# Altium PCB RTL8316_STAND.PcbDoc (part 4 of 4)
Units mm, origin at the board's own origin, x right, y up, seen from the top; angles counter-clockwise.
Board outline 155 x 217 mm, 4 copper layers (Top, Ground, Power, Bottom), stack 1.012 mm thick; 305 components, 396 nets, 1247 pads, 345 vias.
Unrouted connection lines stored in the file: 59.
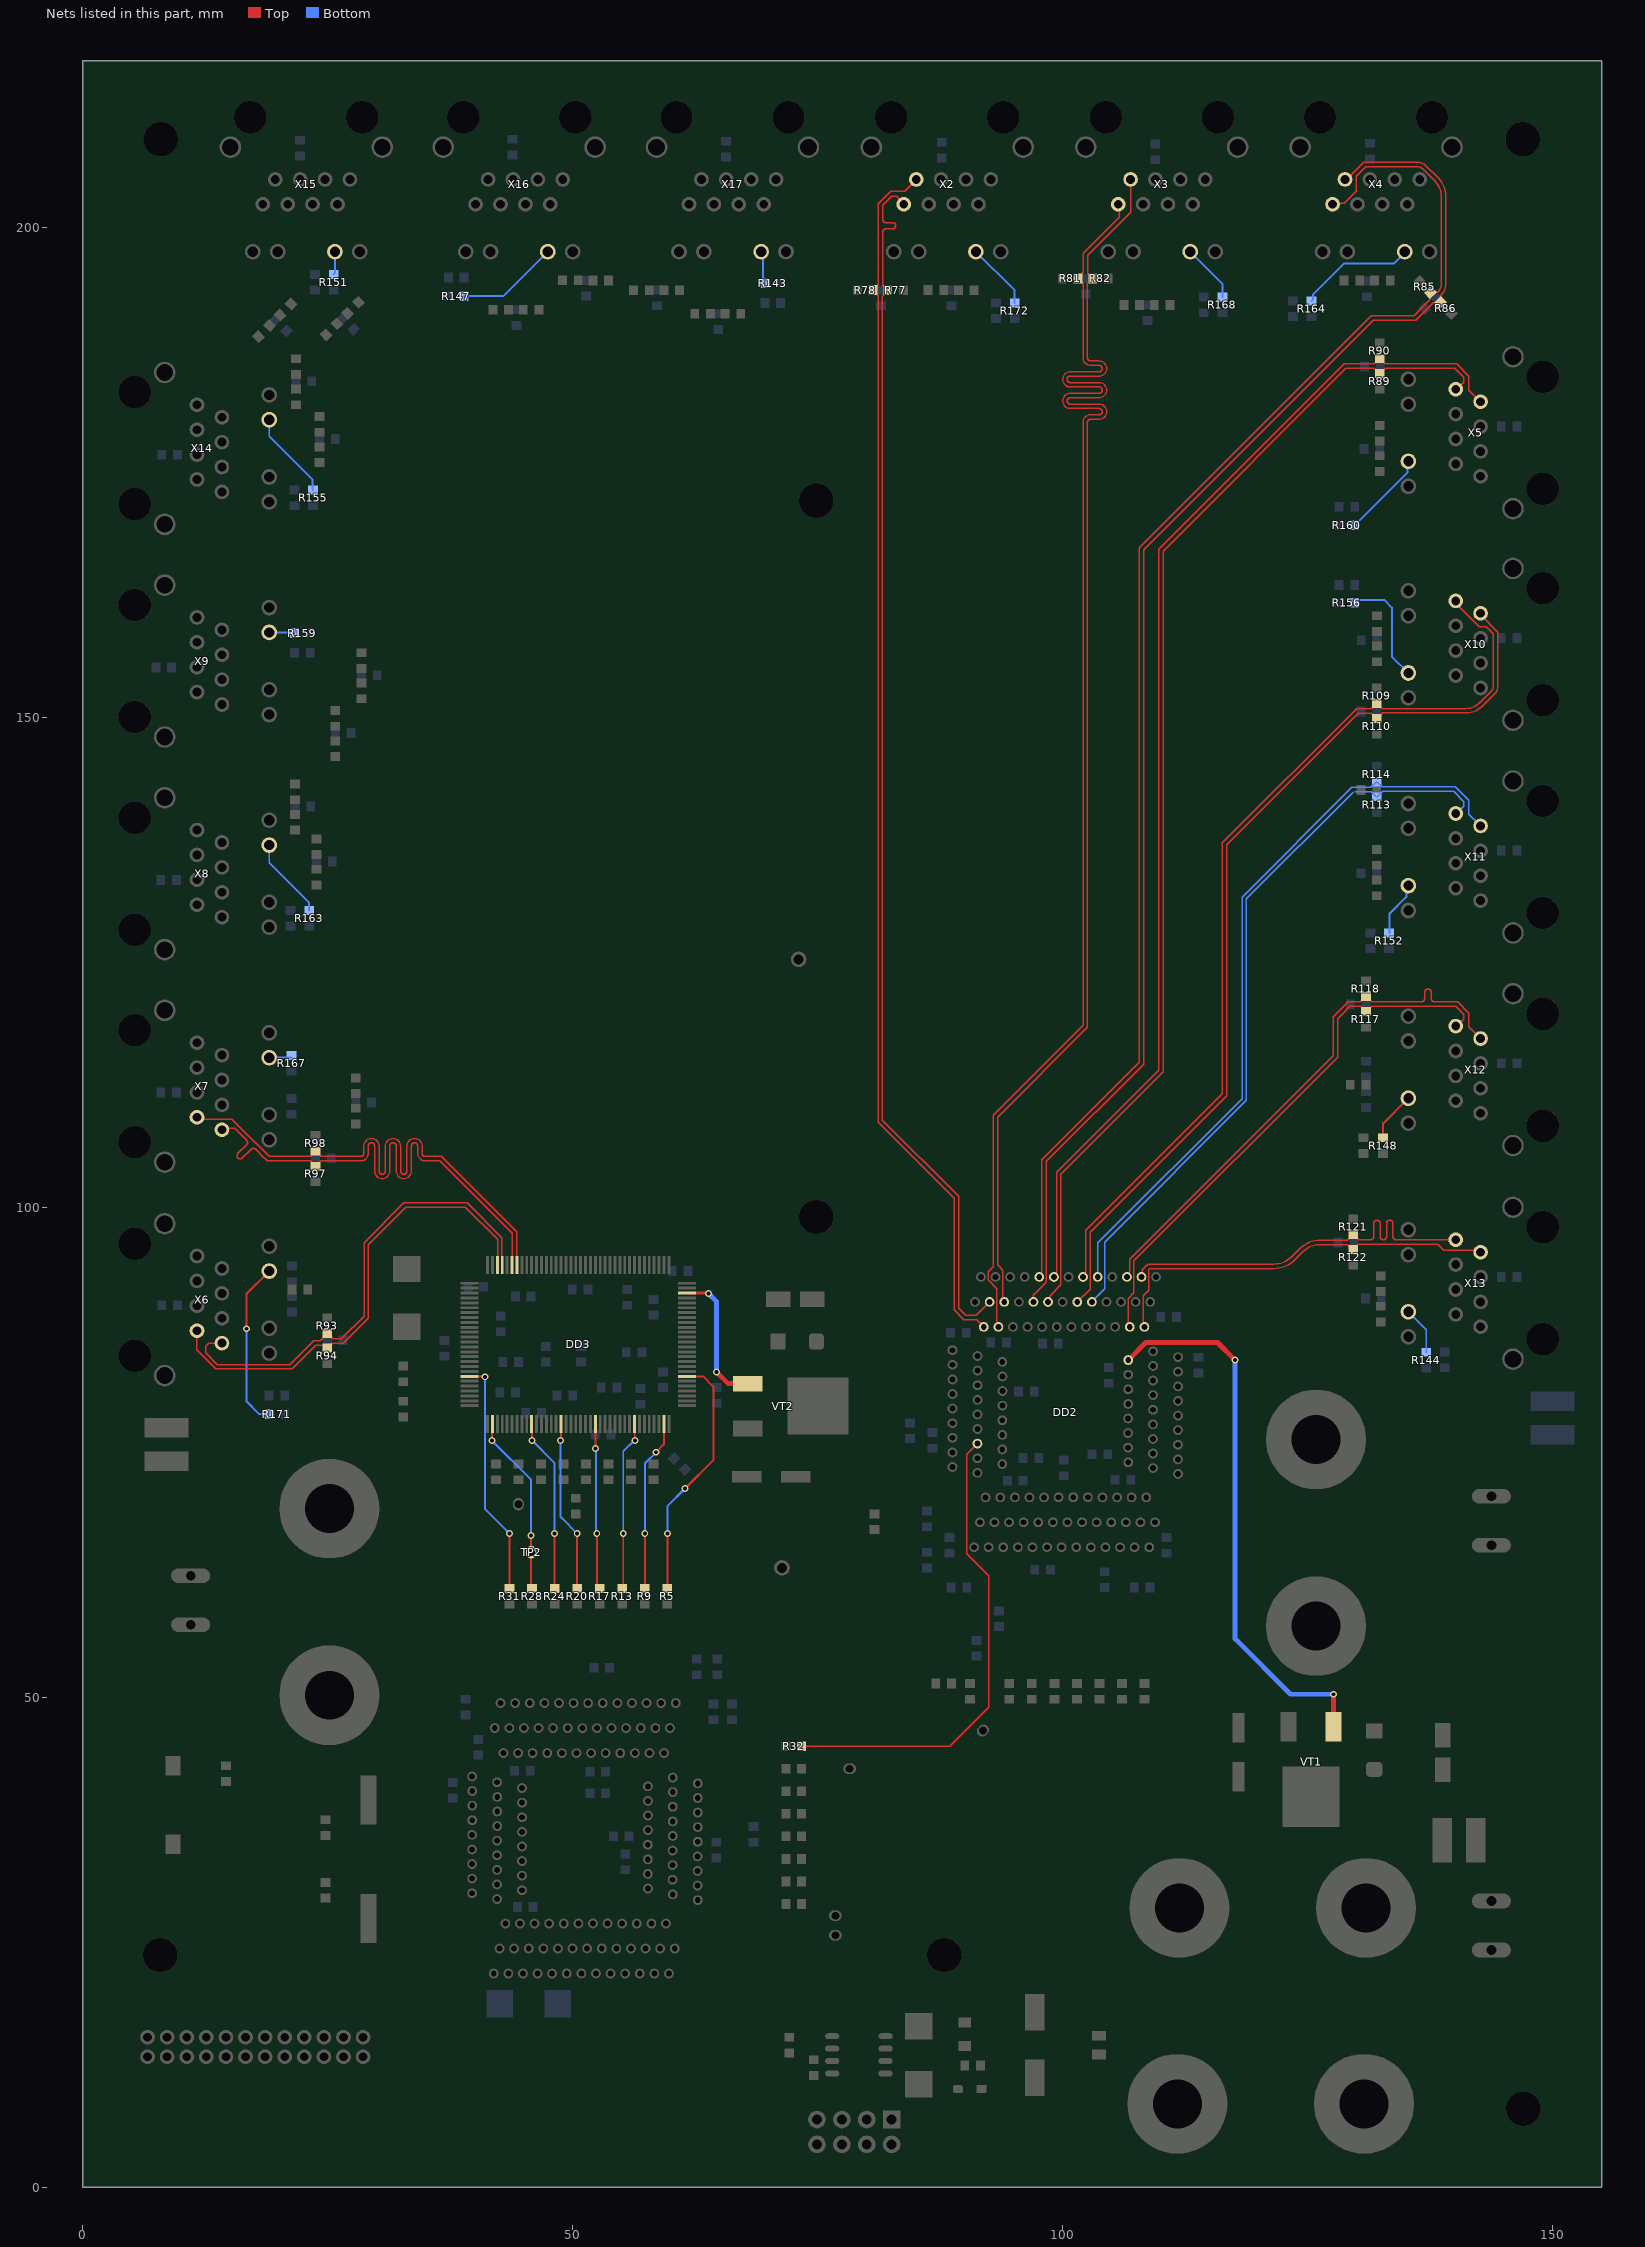
[diagram p6: the nets of this part, all layers, seen from the top]

## Via types
v1: diameter 0.7, hole 0.4, Top to Bottom, tented both sides, 332 vias
v2: diameter 1.2, hole 0.6, Top to Bottom, tented both sides, 11 vias
v3: diameter 0.9, hole 0.4, Top to Bottom, tented both sides, 2 vias

## Nets (pads, with @x,y where several pads share a name; then routed paths per layer and width w, separated by ;. In a path a pad name is that pad's centre, name@x,y a point inside that pad or via, vN(x,y) a via of type N, cw(c..) or ccw(c..) an arc to the next point about the centre after c; other vN are vias at no path point) (continued)
TX6_N: DD3.32 R98.1 X7.2 | length 56.8
  Top w0.15: X7.2@11.65,109.18 11.83,109 15.186,109 16.318,107.868 19,105.186 23.151,105.186 ccw(c23.151,105.394) 23.298,105.247 ccw(c23.233,105.312) 23.325,105.312 cw(c23.417,105.312) 23.352,105.377 23.665,105.69 cw(c23.75,105.604) R98.1@23.75,105.725 cw(c23.75,105.604) 23.835,105.69 24.148,105.377 cw(c24.083,105.312) 24.175,105.312 ccw(c24.267,105.312) 24.202,105.247 24.219,105.23 ccw(c24.325,105.336) 24.325,105.186 28.05,105.186 28.35,105.186 ccw(c28.35,105.511) 28.675,105.511 28.675,106.254 cw(c29.45,106.254) 29.45,107.029 cw(c29.45,106.254) 30.225,106.254 30.225,103.701 ccw(c30.55,103.701) 30.55,103.376 ccw(c30.55,103.701) 30.875,103.701 30.875,106.254 cw(c31.65,106.254) 31.65,107.029 cw(c31.65,106.254) 32.425,106.254 32.425,103.701 ccw(c32.75,103.701) 32.75,103.376 ccw(c32.75,103.701) 33.075,103.701 33.075,106.254 cw(c33.85,106.254) 33.85,107.029 cw(c33.85,106.254) 34.625,106.254 34.625,105.511 ccw(c34.95,105.511) 34.95,105.186 35.85,105.186 36.6,105.186 44.275,97.511 44.275,94.125 DD3.32@44.3,94.1
TX6_P: DD3.33 R97.1 X7.1 | length 56.6
  Top w0.15: X7.1@14.19,107.91 14.333,108.053 15.497,108.053 16.2,107.35 16.253,107.297 16.713,106.837 cw(c16.483,106.608) 16.713,106.378 15.829,105.494 ccw(c16.059,105.264) 15.829,105.034 ccw(c16.059,105.264) 16.289,105.034 17.172,105.918 cw(c17.402,105.688) 17.632,105.918 18.484,105.066 18.537,105.013 18.814,104.736 23.151,104.736 23.237,104.736 23.298,104.675 cw(c23.233,104.61) 23.325,104.61 ccw(c23.417,104.61) 23.352,104.545 23.665,104.232 ccw(c23.75,104.318) R97.1@23.75,104.197 ccw(c23.75,104.318) 23.835,104.232 24.148,104.545 ccw(c24.083,104.61) 24.175,104.61 cw(c24.267,104.61) 24.202,104.675 24.219,104.692 cw(c24.325,104.586) 24.325,104.736 28.05,104.736 28.35,104.736 ccw(c28.35,105.511) 29.125,105.511 29.125,106.254 cw(c29.45,106.254) 29.45,106.579 cw(c29.45,106.254) 29.775,106.254 29.775,103.701 ccw(c30.55,103.701) 30.55,102.926 ccw(c30.55,103.701) 31.325,103.701 31.325,106.254 cw(c31.65,106.254) 31.65,106.579 cw(c31.65,106.254) 31.975,106.254 31.975,103.701 ccw(c32.75,103.701) 32.75,102.926 ccw(c32.75,103.701) 33.525,103.701 33.525,106.254 cw(c33.85,106.254) 33.85,106.579 cw(c33.85,106.254) 34.175,106.254 34.175,105.511 ccw(c34.95,105.511) 34.95,104.736 35.85,104.736 36.414,104.736 43.825,97.325 43.825,94.125 DD3.33@43.8,94.1
TX7: DD2.58 R32.1 | length 49
  Top w0.15: R32.1@73.35,45 88.45,45 92.45,49 92.45,62.4 90.225,64.625 90.225,74.805 DD2.58@91.3,75.88
TX7_N: DD3.36 R94.1 X6.2 | length 48.9
  Top w0.15: X6.2@11.7,87.355 11.65,87.305 ccw(c11.771,87.184) 11.6,87.184 11.6,85.45 13.55,83.5 21.35,83.5 23.75,85.9 24.675,85.9 R94.1@24.95,85.625 ; R94.1@25,85.625 25.488,86.113 26.563,86.113 29.15,88.7 29.15,96.2 32.95,100 39.05,100 42.325,96.725 42.325,94.125 DD3.36@42.3,94.1
TX7_P: DD3.35 R93.1 X6.1 | length 49.1
  Top w0.15: X6.1@14.19,86.135 13.045,86.135 12.836,86.135 12.524,85.824 12.524,85.162 13.736,83.95 21.1,83.95 23.55,86.4 24.225,86.4 R93.1@24.95,87.125 ; R93.1@25,87.125 25.562,86.563 26.376,86.563 28.7,88.886 28.7,96.386 32.764,100.45 39.236,100.45 42.775,96.911 42.775,94.125 DD3.35@42.8,94.1
  Bottom w0.15: X6.1@14.19,86.135 X6.1@14.195,86.14
TX8: DD3.109 R5.1 | length 25.9
  Top w0.2: R5.1@59.65,60.9 R5.1@59.65,61.1 v1(59.65,66.7) ; v1(61.45,71.3) 64.35,74.2 64.35,81.699 63.299,82.75 DD3.109@61.65,82.75
  Bottom w0.2: v1(59.65,66.7) 59.65,69.5 v1(61.45,71.3)
TX8_N: DD2.3 R122.1 X13.2 | length 41.6
  Top w0.15: DD2.3@108.335,87.8 108.21,87.925 108.21,90.96 108.805,91.555 108.805,93.662 108.893,93.75 121.562,93.75 ccw(c121.562,96.74) 123.676,94.626 124.506,95.456 cw(c126.302,93.66) 126.302,96.2 129.1,96.2 129.6,95.7 R122.1@129.65,95.7 129.7,95.7 130.075,96.075 130.075,96.137 130.173,96.235 138.26,96.235 138.895,95.6 142.47,95.6 X13.2@142.65,95.42
TX8_P: DD2.4 R121.1 X13.1 | length 41.1
  Top w0.15: DD2.4@108.04,92.9 108.125,92.985 108.125,93.625 108.425,93.925 108.431,93.925 108.706,94.2 121.562,94.2 ccw(c121.562,96.74) 123.358,94.944 124.188,95.774 cw(c126.302,93.66) 126.302,96.65 129.05,96.65 129.6,97.2 R121.1@129.65,97.2 129.7,97.2 130.215,96.685 131.35,96.685 131.425,96.685 ccw(c131.425,97.01) 131.75,97.01 131.75,98.36 cw(c132.075,98.36) 132.075,98.685 cw(c132.075,98.36) 132.4,98.36 132.4,97.01 ccw(c132.725,97.01) 132.725,96.685 ccw(c132.725,97.01) 133.05,97.01 133.05,98.36 cw(c133.375,98.36) 133.375,98.685 cw(c133.375,98.36) 133.7,98.36 133.7,97.01 ccw(c134.025,97.01) 134.025,96.685 134.45,96.685 135.705,96.685 135.71,96.69 X13.1@140.11,96.69
TX9: DD3.101 R9.1 | length 17.6
  Top w0.2: R9.1@57.35,61.1 v1(57.35,66.7) ; v1(58.5,75) 59.3,75.8 DD3.101@59.3,77.9
  Bottom w0.2: v1(57.35,66.7) 57.35,73.85 v1(58.5,75)
TX9_N: DD2.7 R118.1 X12.2 | length 56
  Top w0.15: DD2.7@106.55,92.9 106.55,93.13 106.825,93.405 106.825,94.711 127.6,115.486 127.6,118.093 127.6,119.45 128.323,120.173 129.03,120.88 129.125,120.975 130.376,120.975 130.901,121.5 R118.1@130.951,121.5 131.001,121.5 131.516,120.985 136.55,120.985 136.625,120.985 ccw(c136.625,121.31) 136.95,121.31 136.95,121.956 cw(c137.275,121.956) 137.275,122.281 cw(c137.275,121.956) 137.6,121.956 137.6,121.31 ccw(c137.925,121.31) 137.925,120.985 138.95,120.985 140.301,120.985 141.462,119.824 141.462,118.408 X12.2@142.65,117.22 X12.2@142.43,117.22
TX9_P: DD2.6 R117.1 X12.1 | length 56.1
  Top w0.15: DD2.6@106.845,87.8 106.697,87.947 106.697,90.691 107.275,91.268 107.275,94.525 128.05,115.3 128.05,118.279 128.05,119.264 128.509,119.723 129.286,120.5 130.4,120.5 130.9,120 R117.1@130.95,120 131,120 131.535,120.535 140.115,120.535 140.95,119.7 140.95,119.209 X12.1@140.231,118.49
TX10: DD3.95 R13.1 | length 17.5
  Top w0.2: R13.1@55.15,61 v1(55.15,66.7) ; DD3.95@56.3,77.9 56.325,77.875 56.325,76.225 v1(56.35,76.2)
  Bottom w0.2: v1(55.15,66.7) 55.15,75.1 56.25,76.2 v1(56.35,76.2)
TX10_N: DD2.13 R114.1 X11.2 | length 76.9
  Bottom w0.15: DD2.13@103.57,92.9 103.57,96.356 103.89,96.676 118.3,111.086 118.3,131.65 129.5,142.85 131.452,142.85 132.001,143.4 R114.1@132.051,143.4 132.101,143.4 132.601,142.9 135.843,142.9 140.086,142.9 141.462,141.524 141.462,140.108 X11.2@142.55,139.02 ; X11.2@142.55,139.02 X11.2@142.65,138.92 X11.2@142.55,139.02
TX10_P: DD2.14 R113.1 X11.1 | length 76.6
  Bottom w0.15: DD2.14@102.975,90.35 104.295,91.67 104.295,96.445 118.75,110.9 118.75,131.464 129.657,142.371 ; 129.786,142.4 131.5,142.4 132,141.9 R113.1@132.05,141.9 132.1,141.9 132.65,142.45 138.65,142.45 139.108,142.45 139.9,142.45 140.95,141.4 140.95,140.909 X11.1@140.231,140.19
TX11: DD3.87 R17.1 | length 17.3
  Top w0.2: v1(52.3,75.4) DD3.87@52.3,77.9 ; v1(52.45,66.7) 52.45,61.3 R17.1@52.902,60.848
  Bottom w0.2: v1(52.3,75.4) 52.375,75.325 52.375,66.775 v1(52.45,66.7)
TX11_N: DD2.17 R110.1 X10.2 | length 96.1
  Top w0.15: DD2.17@101.485,90.34 102.805,91.66 102.805,97.455 116.75,111.4 116.75,137 130.175,150.425 131.475,150.425 132,149.9 R110.1@132.05,149.9 132.1,149.9 132.65,150.45 134.419,150.45 141.15,150.45 ccw(c141.15,152.831) 142.834,151.147 144.056,152.37 ccw(c143.226,153.2) 144.4,153.2 144.4,158.707 142.65,160.457 X10.2@142.65,160.62
TX11_P: DD2.16 R109.1 X10.1 | length 95.6
  Top w0.15: DD2.16@102.08,92.89 102.08,93.12 102.355,93.395 102.355,97.641 116.3,111.586 116.3,137.186 129.989,150.875 131.475,150.875 132,151.4 R109.1@132.05,151.4 132.1,151.4 132.6,150.9 134.232,150.9 141.15,150.9 ccw(c141.15,152.831) 142.516,151.466 143.738,152.688 ccw(c143.226,153.2) 143.95,153.2 143.95,158.521 143.235,159.235 142.515,159.235 140.11,161.64 X10.1@140.11,161.89
TX12: DD3.80 R20.1 | length 17.6
  Top w0.2: v1(48.75,76.2) 48.775,76.225 48.775,77.875 DD3.80@48.8,77.9 ; R20.1@50.45,61.2 v1(50.45,66.7)
  Bottom w0.2: v1(48.75,76.2) 48.75,68.4 48.95,68.2 ; 48.85,68.3 v1(50.45,66.7)
TX12_N: DD2.22 R90.1 X5.2 | length 122.2
  Top w0.15: DD2.22@99.1,92.89 99.1,93.12 99.375,93.395 99.375,103.575 109.8,114 109.8,167.15 128.725,186.075 131.775,186.075 131.925,186.225 132.3,186.6 R90.1@132.35,186.6 132.4,186.6 132.925,186.075 140.211,186.075 141.462,184.824 141.462,183.408 X5.2@142.65,182.22
TX12_P: DD2.23 R89.1 X5.1 | length 122.4
  Top w0.15: DD2.23@98.505,90.34 98.66,90.495 98.66,90.91 99.825,92.075 99.825,103.389 110.25,113.814 110.25,166.964 128.911,185.625 131.775,185.625 132.3,185.1 R89.1@132.35,185.1 132.4,185.1 132.925,185.625 140.025,185.625 140.95,184.7 140.95,184.209 140.231,183.49 X5.1@140.11,183.49
TX13: DD3.74 R24.1 | length 18.3
  Top w0.2: DD3.74@45.8,77.9 45.825,77.875 45.825,76.225 v1(45.85,76.2) ; R24.1@48.15,60.9 R24.1@48.15,61.1 v1(48.15,66.7)
  Bottom w0.2: v1(45.85,76.2) 48.05,74 ; 47.85,74.2 48.15,73.9 v1(48.15,66.7)
TX13_N: DD2.26 R86.1 X4.2 | length 145.9
  Top w0.15: DD2.26@97.015,90.35 97.015,91.015 98.335,92.335 98.335,104.685 108.25,114.6 108.25,167.1 131.7,190.55 136.042,190.55 137.792,192.3 138.508,192.3 R86.1@138.543,192.335 ; X4.2@128.973,204.9 130.723,206.65 136.23,206.65 cw(c136.23,205.476) 137.06,206.306 138.353,205.013 cw(c136.551,203.211) 139.1,203.211 139.1,194.272 cw(c137.481,194.272) 138.626,193.127 ccw(c138.805,192.947) 138.552,192.947 ccw(c138.598,192.947) 138.565,192.915 cw(c138.532,192.882) 138.579,192.882 138.579,192.421 cw(c138.458,192.421) R86.1@138.543,192.335
TX13_P: DD2.25 R85.1 X4.1 | length 145.4
  Top w0.15: DD2.25@97.61,92.9 97.61,93.13 97.885,93.405 97.885,104.871 107.8,114.786 107.8,167.286 131.514,191 135.856,191 136.599,191.744 137.484,192.628 R85.1@137.484,193.334 ; X4.1@127.54,202.36 127.657,202.477 128.727,202.477 129.95,203.7 129.95,205.241 130.909,206.2 136.23,206.2 cw(c136.23,205.476) 136.742,205.988 137.964,204.766 cw(c136.309,203.11) 138.65,203.11 138.65,194.272 cw(c137.481,194.272) 138.311,193.448 cw(c138.135,193.626) 138.135,193.376 cw(c138.135,193.426) 138.099,193.39 ccw(c138.064,193.355) 138.064,193.405 137.605,193.405 ccw(c137.605,193.284) R85.1@137.519,193.37
TX14: DD3.66 R28.1 TP2.1 | length 18.5
  Top w0.2: v1(41.75,76.2) 41.775,76.225 41.775,77.875 DD3.66@41.8,77.9 ; R28.1@45.75,61.1 v1(45.75,66.5)
  Bottom w0.2: v1(41.75,76.2) 45.75,72.2 v1(45.75,66.5)
TX14_N: DD2.32 R82.1 X3.2 | length 138.1
  Top w0.15: DD2.32@94.035,90.35 93.905,90.48 93.905,93.595 93.35,94.15 93.35,95.471 93.35,109.2 102.525,118.375 102.525,178.976 102.525,180.1 cw(c102.85,180.1) 102.85,180.425 103.711,180.425 ccw(c103.711,181.2) 104.486,181.2 ccw(c103.711,181.2) 103.711,181.975 100.774,181.975 cw(c100.774,182.3) 100.449,182.3 cw(c100.774,182.3) 100.774,182.625 103.711,182.625 ccw(c103.711,183.4) 104.486,183.4 ccw(c103.711,183.4) 103.711,184.175 100.774,184.175 cw(c100.774,184.5) 100.449,184.5 cw(c100.774,184.5) 100.774,184.825 103.711,184.825 ccw(c103.711,185.6) 104.486,185.6 ccw(c103.711,185.6) 103.711,186.375 102.85,186.375 cw(c102.85,186.7) 102.525,186.7 102.525,187 102.525,194.287 102.613,194.375 102.675,194.375 103.05,194.75 R82.1@103.05,194.8 103.05,194.85 102.563,195.337 102.563,197.176 106.93,201.544 X3.2@106.93,204.9
TX14_P: DD2.33 R81.1 X3.1 | length 138.3
  Top w0.15: DD2.33@93.435,87.8 93.272,87.963 93.272,88.311 93.27,88.313 93.27,91.687 92.375,92.582 92.375,93.425 92.54,93.59 92.9,93.95 92.9,95.658 92.9,109.386 102.075,118.561 102.075,178.976 102.075,180.1 cw(c102.85,180.1) 102.85,180.875 103.711,180.875 ccw(c103.711,181.2) 104.036,181.2 ccw(c103.711,181.2) 103.711,181.525 100.774,181.525 cw(c100.774,182.3) 99.999,182.3 cw(c100.774,182.3) 100.774,183.075 103.711,183.075 ccw(c103.711,183.4) 104.036,183.4 ccw(c103.711,183.4) 103.711,183.725 100.774,183.725 cw(c100.774,184.5) 99.999,184.5 cw(c100.774,184.5) 100.774,185.275 103.711,185.275 ccw(c103.711,185.6) 104.036,185.6 ccw(c103.711,185.6) 103.711,185.925 102.85,185.925 cw(c102.85,186.7) 102.075,186.7 102.075,187 102.075,194.289 101.987,194.376 101.925,194.376 101.55,194.751 101.55,194.851 102.113,195.414 102.113,197.363 105.785,201.035 105.785,202.235 X3.1@105.66,202.36
TX15: DD3.58 R31.1 | length 24.3
  Top w0.2: DD3.58@39.45,82.75 39.475,82.725 41.025,82.725 v1(41.05,82.7) ; R31.1@43.55,61.1 v1(43.55,66.7)
  Bottom w0.2: v1(41.05,82.7) 41.05,69.2 v1(43.55,66.7)
TX15_N: DD2.36 R78.1 X2.2 | length 125.2
  Top w0.15: X2.2@85.05,204.9 83.862,203.712 82.446,203.712 81.175,202.442 81.175,194.177 80.65,193.651 80.65,193.551 81.15,193.052 81.15,172.586 81.15,108.7 88.932,100.918 88.932,89.518 89.91,88.54 91.205,88.54 DD2.36@91.945,87.8
TX15_P: DD2.35 R77.1 X2.1 | length 125.2
  Top w0.15: X2.1@83.78,202.481 83.061,203.2 82.57,203.2 81.625,202.255 81.625,201.3 81.625,200.825 ccw(c81.95,200.825) 81.95,200.5 82.624,200.5 cw(c82.624,200.175) 82.949,200.175 cw(c82.624,200.175) 82.624,199.85 81.95,199.85 ccw(c81.95,199.525) 81.625,199.525 81.625,198.8 81.625,194.175 82.15,193.65 82.15,193.55 81.6,193 81.6,172.4 81.6,108.886 89.382,101.105 89.382,89.705 90.096,88.99 91.185,88.99 DD2.35@92.545,90.35
VCTRL: DD3.126 VT2.1 | length 14.2
  Top w0.2: v1@63.8,91.25 v1(63.85,91.2)
  Top w0.3: DD3.126@61.65,91.25 v1@63.8,91.25
  Top w0.5: v1(64.65,83.2) 65.85,82 VT2.1@67.85,82
  Bottom w0.5: v1(63.85,91.2) 64.65,90.4 v1(64.65,83.2)
VCTRL_1: DD2.126 VT1.1 | length 56.6
  Top w0.5: DD2.126@106.685,84.405 108.48,86.2 115.8,86.2 v1(117.6,84.4) ; VT1.1@127.63,47 127.65,47.02 v1(127.65,50.3)
  Bottom w0.5: v1(117.6,84.4) 117.6,55.95 123.25,50.3 v1(127.65,50.3)
Y-1: R143.1 X17.11 | length 3.4
  Bottom w0.2: X17.11@69.22,197.53 69.4,197.35 69.4,194.5 R143.1@69.6,194.3
Y-2: R147.1 X16.11 | length 10.4
  Bottom w0.2: R147.1@38.9,193 42.915,193 X16.11@47.445,197.53
Y-3: R151.1 X15.11 | length 2.4
  Bottom w0.2: R151.1@25.6,195.2 25.725,195.325 X15.11@25.725,197.53
Y-4: R155.1 X14.11 | length 9
  Bottom w0.2: X14.11@19.02,180.37 19.02,178.68 23.45,174.25 23.45,173.25 R155.1@23.5,173.2
Y-5: R159.1 X9.11 | length 2.6
  Bottom w0.2: X9.11@19.02,158.67 21.53,158.67 R159.1@21.6,158.6
Y-6: R163.1 X8.11 | length 8.4
  Bottom w0.2: X8.11@19.02,136.97 19.02,135.18 23.1,131.1 R163.1@23.1,130.3
Y-7: R167.1 X7.11 | length 2.3
  Bottom w0.2: X7.11@19.02,115.27 21.27,115.27 R167.1@21.3,115.3
Y-8: R171.1 X6.11 | length 17.1
  Top w0.2: v1(16.7,87.6) 16.7,91.175 X6.11@19.02,93.495
  Bottom w0.2: v1(16.7,87.6) 16.7,80.2 18,78.9 R171.1@19,78.9
Y-9: R144.2 X13.11 | length 4.9
  Bottom w0.2: X13.11@135.28,89.33 137.1,87.51 R144.2@137.1,85.2
Y-10: R148.2 X12.11 | length 5.1
  Top w0.2: R148.2@132.7,107.1 132.7,108.55 X12.11@135.28,111.13
Y-11: R152.2 X11.11 | length 5.6
  Bottom w0.2: R152.2@133.35,128 133.35,129.95 135.077,131.677 135.077,132.627 X11.11@135.28,132.83
Y-12: R156.2 X10.11 | length 11.6
  Bottom w0.2: R156.2@129.8,161.7 130.1,162 132.8,162 133.6,161.2 133.6,156.21 X10.11@135.28,154.53
Y-13: R160.2 X5.11 | length 8.8
  Bottom w0.2: R160.2@129.8,169.6 129.8,169.65 130.15,170 130.2,170 135.196,174.996 135.196,176.046 X5.11@135.28,176.13
Y-14: R164.2 X4.11 | length 12
  Bottom w0.2: R164.2@125.4,192.5 125.533,192.633 125.533,193.133 128.7,196.3 133.8,196.3 134.9,197.4 X4.11@134.9,197.53
Y-15: R168.2 X3.11 | length 6
  Bottom w0.2: X3.11@113.02,197.53 116.3,194.25 R168.2@116.3,192.9
Y-16: R172.2 X2.11 | length 6.9
  Bottom w0.2: X2.11@91.14,197.53 95.1,193.57 R172.2@95.1,192.3
pads on no net: X2.0 X3.0 X4.0 X5.0 X6.0 X7.0 X8.0 X9.0 X10.0 X11.0 X12.0 X13.0 X14.0 X15.0 X16.0 X17.0

## Polygon pours and split planes (outlines as drawn)
GND on Top "GNDB_TOP" (solid, remove dead copper, pour order 20): 0.95,1 153.95,1 153.95,216 0.95,216
NetVD4_2 on Top "GNDB_TOP" (solid, remove dead copper, pour order 18): 77.475,88.4 77.5,88.375 77.5,86.1 80.1,83.5 80.1,74.9 70.8,74.9 70.8,80.6 70.8,84.3 73.6,84.3 73.6,88.4
3V3 on Top "GNDB_TOP" (solid, remove dead copper, pour order 6): 122.8,52 125.45,49.35 125.45,44.8 125.15,44.5 115.45,44.5 115.45,52
1V8_DUT_IN on Top "GNDB_TOP" (solid, remove dead copper, pour order 0): 129.3,51.1 140.9,51.1 141.4,50.6 141.4,44.5 129.3,44.5
NetVD3_2 on Top "GNDB_TOP" (solid, remove dead copper, pour order 19): 120.55,44 136.05,44 136.05,36.3 134.05,34.3 122.05,34.3 120.55,35.8
1V8 on Top "GNDB_TOP" (solid, remove dead copper, pour order 2): 72.6,84.8 66.5,84.8 66.5,89.5 69.6,92.6 72.6,92.6
3V3 on Top "GNDB_TOP" (solid, remove dead copper, pour order 10): 64.95,79.4 70.25,79.4 70.25,69.8 69.35,68.9 64.95,68.9
EEP_PWR on Top "GNDB_TOP" (solid, remove dead copper, pour order 5): 71.3,14.4 72.9,14.4 72.9,13 73.8,12.1 77.3,12.1 77.4,12 77.4,10.7 76.9,10.2 71.4,10.2 71.2,10.4 71.2,14.3
3V3 on Top "GNDB_TOP" (solid, remove dead copper, pour order 16): 117.35,14.2 92,14.2 90.9,13.1 90.9,7.85 93.05,5.7 105.15,5.7 108.05,2.8 117.35,2.8
DGND on Top "GNDB_TOP" (solid, remove dead copper, pour order 17): 78.15,16.1 78.15,13.3 85.7,13.3 88.1,15.7 91.75,15.7 91.75,18.4 90.55,19.6 81.65,19.6
1V8 on Power "GNDB_TOP" (solid, remove dead copper, pour order 8): 0.95,78.5 29.95,78.5 29.95,90.5 36.95,90.5 54.6,90.5 60.3,84.8 82.5,84.8 82.5,98.55 77.05,104 77.05,216 0.95,216
3V3 on Power "GNDB_TOP" (solid, remove dead copper, pour order 7): 0.95,1 0.95,78.5 29.95,78.5 29.95,90.5 36.95,90.5 54.6,90.5 60.3,84.8 85.55,84.8 98.35,72 153.95,72 153.95,1
3V3_8316 on Power "GNDB_TOP" (solid, pour order 3): 16.55,58.3 68.95,58.3 68.95,9.4 16.55,9.4
3V3_8208_DUT on Power "GNDB_TOP" (solid, pour order 4): 118.55,72 118.55,60 83,60 83,84.8 99.65,84.8 100.45,84 100.45,77.7 106.15,72
1V8_DUT on Power "GNDB_TOP" (solid, remove dead copper, pour order 9): 77.55,216 153.95,216 153.95,72 106.15,72 100.45,77.7 100.45,84 99.15,85.3 82.95,85.3 82.95,98.2 77.55,103.6
AGND on Ground "GNDB_TOP" (solid, remove dead copper, pour order 15): 1.053,75.7 23.45,75.7 29.45,81.7 29.45,87.5 30.45,88.5 79.75,88.5 85.95,82.3 102.35,82.3 105.55,79.1 115.65,79.1 119.15,82.6 132.45,82.6 132.45,74 133.45,73 153.95,73 153.95,216 0.955,216
DGND on Ground "GNDB_TOP" (solid, remove dead copper, pour order 13): 0.95,75.3 23.35,75.3 29.45,81.4 29.45,87.5 30.25,88.3 79.95,88.3 85.95,82.3 102.35,82.3 105.55,79.1 115.65,79.1 119.15,82.6 132.45,82.6 132.45,74 133.45,73 153.95,73 153.95,1 0.95,1
GND on Bottom "GNDB_TOP" (solid, remove dead copper, pour order 11): 0.95,1 153.95,1 153.95,216 0.95,216

## Other copper
Top:
  drawing of 526 lines, arcs and shapes, not listed
Ground:
  pour cut-out: 59.718,21.1 47.89,21.1 47.89,21.8
  pour cut-out: 47.982,22.5 59.81,22.5 59.81,21.8
  pour cut-out: 44.818,21.1 41.93,21.1 41.93,21.8
  pour cut-out: 42.022,22.5 44.91,22.5 44.91,21.8
  pour cut-out: 60.313,25.05 42.525,25.05 42.525,24.35
  pour cut-out: 42.433,23.65 60.405,23.65 60.405,24.349
  pour cut-out: 53.453,26.21 46.095,26.21 46.095,26.9
  pour cut-out: 46.187,27.6 53.545,27.6 53.545,26.91
  pour cut-out: 42.98,29.308 42.98,30.89 42.28,30.89
  pour cut-out: 41.58,30.798 41.58,29.4 42.28,29.4
  pour cut-out: 45.515,30.387 45.515,37.745 44.825,37.745
  pour cut-out: 44.125,37.653 44.125,30.295 44.815,30.295
  pour cut-out: 42.98,41.228 42.98,35.36 42.28,35.36
  pour cut-out: 41.58,41.228 41.58,35.36 42.28,35.36
  pour cut-out: 40.43,30.087 40.43,41.915 39.73,41.915
  pour cut-out: 39.03,41.823 39.03,29.995 39.73,29.995
  pour cut-out: 60.9,29.788 60.9,32.925 60.255,32.925
  pour cut-out: 59.49,32.768 59.49,29.88 60.2,29.88
  pour cut-out: 63.44,33.847 63.44,29.285 62.75,29.285
  pour cut-out: 62.04,33.663 62.04,29.285 62.75,29.285
  pour cut-out: 63.45,36.827 63.45,41.205 62.75,41.205
  pour cut-out: 62.05,41.113 62.05,36.735 62.75,36.735
  pour cut-out: 60.9,35.932 60.9,41.8 60.2,41.8
  pour cut-out: 59.5,41.708 59.5,35.905 60.265,35.905
  pour cut-out: 58.365,30.567 58.365,40.905 57.665,40.905
  pour cut-out: 56.965,40.813 56.965,30.475 57.665,30.475
  pour cut-out: 59.223,43.6 53.355,43.6 53.355,44.3
  pour cut-out: 53.447,45 59.315,45 59.315,44.3
  pour cut-out: 50.467,43.59 45.905,43.59 45.905,44.3
  pour cut-out: 45.997,45 50.375,45 50.375,44.29
  pour cut-out: 59.823,46.15 49.485,46.15 49.485,46.84
  pour cut-out: 49.577,47.54 59.915,47.54 59.915,46.85
  pour cut-out: 46.413,46.15 42.035,46.15 42.035,46.85
  pour cut-out: 42.127,47.55 46.505,47.55 46.505,46.85
  pour cut-out: 58.928,48.7 42.63,48.7 42.63,49.4
  pour cut-out: 42.722,50.1 59.02,50.1 59.02,49.4
  pour cut-out: 92.037,87.1 100.885,87.1 100.885,87.79
  pour cut-out: 100.793,88.49 91.945,88.49 91.945,87.8
  pour cut-out: 108.243,87.1 103.865,87.1 103.865,87.8
  pour cut-out: 103.957,88.5 108.335,88.5 108.335,87.8
  pour cut-out: 105.863,89.65 97.015,89.65 97.015,90.35
  pour cut-out: 97.107,91.05 105.955,91.05 105.955,90.35
  pour cut-out: 93.943,89.65 90.99,89.65 90.99,90.415
  pour cut-out: 91.147,91.05 94.035,91.05 94.035,90.35
  pour cut-out: 109.438,92.2 91.65,92.2 91.65,92.9
  pour cut-out: 91.742,93.6 109.53,93.6 109.53,92.9
  pour cut-out: 112.47,72.877 112.47,80.235 111.77,80.235
  pour cut-out: 111.07,80.143 111.07,72.785 111.77,72.785
  pour cut-out: 112.47,83.307 112.47,84.705 111.77,84.705
  pour cut-out: 111.07,84.613 111.07,83.215 111.77,83.215
  pour cut-out: 109.91,74.962 109.91,85.3 109.22,85.3
  pour cut-out: 108.52,85.208 108.52,74.805 109.145,74.805
  pour cut-out: 107.385,74.067 107.385,81.425 106.685,81.425
  pour cut-out: 105.985,81.333 105.985,73.975 106.685,73.975
  pour cut-out: 108.738,64.6 104.36,64.6 104.36,65.3
  pour cut-out: 104.452,66 108.83,66 108.83,65.3
  pour cut-out: 101.288,64.61 90.95,64.61 90.95,65.3
  pour cut-out: 91.042,66 101.38,66 101.38,65.31
  pour cut-out: 109.333,67.15 94.525,67.15 94.525,67.85
  pour cut-out: 94.617,68.55 109.425,68.55 109.425,67.85
  pour cut-out: 108.433,69.7 92.135,69.7 92.135,70.4
  pour cut-out: 92.405,71.052 108.525,71.052 108.525,70.4
  pour cut-out: 94.535,73.887 94.535,79.755 93.845,79.755
  pour cut-out: 93.145,79.663 93.145,73.795 93.835,73.795
  pour cut-out: 94.535,84.317 94.535,82.735 93.845,82.735
  pour cut-out: 93.135,84.317 93.135,82.735 93.845,82.735
  pour cut-out: 92,75.788 92,83.33 91.31,83.33
  pour cut-out: 90.635,83.419 90.635,75.88 91.3,75.88
  pour cut-out: 89.45,73.587 89.45,83.925 88.76,83.925
  pour cut-out: 88.06,84.017 88.06,73.495 88.75,73.495
  pour cut-out: 98.95,81.309 98.95,82.4 98.3,82.4
  pour cut-out: 97.75,82.291 97.75,81.2 98.4,81.2
  pour cut-out: 8.725,12.35 22.6,12.35 22.6,13.3
  pour cut-out: 7.65,15.175 7.65,13.3 8.6,13.3
  pour cut-out: 8.725,16.25 28.6,16.25 28.6,15.3
  pour cut-out: 136.909,117.05 136.212,117.05 136.212,116.584
  pour cut-out: 136.691,118.15 136.691,117.97 135.412,117.97
  pour cut-out: 117,61.409 117,64.6 116.45,64.6
  pour cut-out: 115.9,64.491 115.9,61.3 116.45,61.3
  pour cut-out: 107.35,78.534 107.35,79.935 106.685,79.935
  pour cut-out: 106,78.356 106,79.935 106.685,79.935
  pour cut-out: 91.985,83.419 91.985,81.84 91.31,81.84
  pour cut-out: 90.635,83.419 90.635,81.84 91.31,81.84
  pour cut-out: 84.925,83.876 84.925,82.79 86.454,82.79
  pour cut-out: 85.666,81.388 85.666,82.5 86.75,82.5
  pour cut-out: 84.088,82.734 84.888,82.734 84.888,81.234
  pour cut-out: 83.134,84.088 84.088,84.088 84.088,82.734
  pour cut-out: 67.75,88.81 68.85,88.81 68.85,88.5
  pour cut-out: 68.85,87.491 68.85,88.5 68.5,88.5
  pour cut-out: 67.75,87.491 67.75,88.5 68,88.5
  pour cut-out: 77.891,90.05 76.275,90.05 76.275,90.6
  pour cut-out: 76.166,91.15 78,91.15 78,90.6
  pour cut-out: 63.85,90.091 63.85,91.25 63.5,91.25
  pour cut-out: 64.175,92.334 64.175,91.2 63.85,91.2
  pour cut-out: 63.075,92.334 63.075,90.2 63.3,90.2
  pour cut-out: 44.7,89.509 44.7,88.5 44.5,88.5
  pour cut-out: 43.6,89.509 43.6,88.5 44,88.5
  pour cut-out: 40.409,93.65 39.309,93.65 39.309,93.55
  pour cut-out: 39.091,94.65 40.191,94.65 40.191,94.75
  pour cut-out: 35,99.059 35,98.1 34.45,98.1
  pour cut-out: 33.9,99.059 33.9,98.1 34.45,98.1
  pour cut-out: 112.809,143.75 111.85,143.75 111.85,144.3
  pour cut-out: 111.741,144.85 112.7,144.85 112.7,144.3
  pour cut-out: 33.112,91.766 33.45,90.5 35.512,89.966
  pour cut-out: 32.488,90.834 34.5,90.5 34.888,89.034
  pour cut-out: 35.95,87.809 35.95,88.655 35.555,88.655
  pour cut-out: 34.85,87.591 34.85,88.655 35.24,88.655
  pour cut-out: 40.05,79.009 40.05,78 39.7,78
  pour cut-out: 39.15,77.891 39.15,78.9 39.5,78.9
  pour cut-out: 42.8,25.709 42.8,24.35 42.525,24.35
  pour cut-out: 41.85,24.439 41.85,25.6 42.25,25.6
  pour cut-out: 83.62,85.351 85.422,83.549 85.422,83.536 85.064,83.536 83.8,84.8
  pour cut-out: 35.079,88.81 35.71,88.81 35.4,88.5
  pour cut-out: 23.55,13.425 23.375,13.425 22.5,14.3 23.5,15.3 28.1,15.3 28.6,14.8 28.6,14.35 23.55,14.35
  pour cut-out: 115.439,79.61 115.437,79.608 109.867,79.608 110.2,79.275 110.225,79.3 115.575,79.3
Power:
  pour cut-out: 109.438,92.2 106.55,92.2 106.55,92.9
  pour cut-out: 106.642,93.6 109.53,93.6 109.53,92.9
  pour cut-out: 94.722,92.2 103.57,92.2 103.57,92.9
  pour cut-out: 94.722,93.6 103.57,93.6 103.57,92.9
  pour cut-out: 108.843,89.65 91.055,89.65 91.055,90.35
  pour cut-out: 91.147,91.05 108.935,91.05 108.935,90.35
  pour cut-out: 108.243,87.1 99.395,87.1 99.395,87.79
  pour cut-out: 99.487,88.49 108.335,88.49 108.335,87.8
  pour cut-out: 92.037,88.5 96.415,88.5 96.415,87.8
  pour cut-out: 92.215,87.148 96.415,87.148 96.415,87.8
  pour cut-out: 92.01,83.238 92.01,84.886 91.3,84.886
  pour cut-out: 90.61,83.238 90.61,84.886 91.3,84.886
  pour cut-out: 89.45,73.403 89.45,85.415 88.75,85.415
  pour cut-out: 88.05,73.587 88.05,85.415 88.75,85.415
  pour cut-out: 92.01,80.258 92.01,72.9 91.3,72.9
  pour cut-out: 90.6,72.992 90.6,80.35 91.31,80.35
  pour cut-out: 94.535,73.703 94.535,85 93.567,85
  pour cut-out: 93.135,73.887 93.135,85 94,85
  pour cut-out: 107.385,84.313 107.385,81.425 106.685,81.425
  pour cut-out: 105.985,81.517 105.985,84.405 106.685,84.405
  pour cut-out: 107.375,78.353 107.375,73.975 106.685,73.975
  pour cut-out: 105.985,73.883 105.985,78.445 106.675,78.445
  pour cut-out: 109.92,83.718 109.92,73.38 109.22,73.38
  pour cut-out: 108.52,73.472 108.52,83.81 109.22,83.81
  pour cut-out: 112.47,78.653 112.47,72.25 111.75,72.25
  pour cut-out: 111.07,78.653 111.07,72.785 111.77,72.785
  pour cut-out: 92.227,69.7 108.525,69.7 108.525,70.4
  pour cut-out: 92.227,71.1 108.525,71.1 108.525,70.4
  pour cut-out: 91.637,68.55 103.465,68.55 103.465,67.85
  pour cut-out: 103.373,67.15 91.545,67.15 91.545,67.85
  pour cut-out: 108.738,64.6 93.93,64.6 93.93,65.3
  pour cut-out: 94.022,66 108.83,66 108.83,65.3
  pour cut-out: 43.433,46.15 42.035,46.15 42.035,46.85
  pour cut-out: 42.127,47.55 43.525,47.55 43.525,46.85
  pour cut-out: 47.008,48.7 42.63,48.7 42.63,49.4
  pour cut-out: 42.722,50.1 47.1,50.1 47.1,49.4
  pour cut-out: 54.458,48.7 53.06,48.7 53.06,49.39
  pour cut-out: 53.152,50.09 54.55,50.09 54.55,49.4
  pour cut-out: 60.418,48.7 57.53,48.7 57.53,49.4
  pour cut-out: 57.622,50.1 60.51,50.1 60.51,49.4
  pour cut-out: 52.373,46.14 46.505,46.14 46.505,46.85
  pour cut-out: 46.597,47.55 52.465,47.55 52.465,46.84
  pour cut-out: 59.823,46.15 55.445,46.15 55.445,46.85
  pour cut-out: 55.537,47.55 59.915,47.55 59.915,46.85
  pour cut-out: 59.223,43.6 54.845,43.6 54.845,44.3
  pour cut-out: 54.937,45 59.315,45 59.315,44.3
  pour cut-out: 51.773,43.59 42.864,43.59 42.864,44.3
  pour cut-out: 43.017,45 51.865,45 51.865,44.29
  pour cut-out: 63.44,32.173 63.44,29.213 62.678,29.213
  pour cut-out: 62.04,32.173 62.04,29.285 62.75,29.285
  pour cut-out: 63.45,41.113 63.45,35.245 62.75,35.245
  pour cut-out: 62.05,41.113 62.05,35.245 62.75,35.245
  pour cut-out: 60.9,29.972 60.9,40.31 60.2,40.31
  pour cut-out: 59.5,40.218 59.5,29.88 60.2,29.88
  pour cut-out: 58.365,30.383 58.365,40.905 57.665,40.905
  pour cut-out: 56.965,40.813 56.965,30.475 57.665,30.475
  pour cut-out: 59.718,21.1 52.36,21.1 52.36,21.81
  pour cut-out: 52.452,22.51 59.81,22.51 59.81,21.8
  pour cut-out: 49.288,21.11 46.4,21.11 46.4,21.8
  pour cut-out: 46.492,22.5 49.38,22.5 49.38,21.81
  pour cut-out: 42.022,21.1 43.42,21.1 43.42,21.8
  pour cut-out: 42.022,22.5 43.42,22.5 43.42,21.8
  pour cut-out: 60.313,23.65 58.915,23.65 58.915,24.35
  pour cut-out: 59.007,25.05 60.405,25.05 60.405,24.35
  pour cut-out: 42.617,23.65 55.935,23.65 55.935,24.35
  pour cut-out: 55.843,25.05 42.525,25.05 42.525,24.35
  pour cut-out: 59.413,26.2 43.115,26.2 43.115,26.9
  pour cut-out: 43.207,27.6 59.505,27.6 59.505,26.9
  pour cut-out: 45.515,40.633 45.515,33.21 44.75,33.21
  pour cut-out: 44.115,33.367 44.115,40.725 44.815,40.725
  pour cut-out: 42.99,38.432 42.99,29.392 42.273,29.392
  pour cut-out: 41.58,29.308 41.58,38.34 42.29,38.34
  pour cut-out: 40.43,35.863 40.43,41.915 39.73,41.915
  pour cut-out: 39.03,41.823 39.03,35.955 39.73,35.955
  pour cut-out: 75.081,169.75 77.56,169.75 77.56,170.871
  pour cut-out: 75.081,174.45 77.25,174.45 77.25,173
  pour cut-out: 146.362,70.5 146.362,72.25 145.75,72.25
  pour cut-out: 141.138,70.5 141.138,72.25 141.5,72.25
  pour cut-out: 117.4,42.791 117.4,40.9 117.95,40.9
  pour cut-out: 118.5,42.791 118.5,40.9 117.95,40.9
  pour cut-out: 41.784,25.288 41.85,25.288 41.85,24.261
  pour cut-out: 42.8,25.709 42.8,24.439 43.2,24.439
  pour cut-out: 6.725,12.35 28.6,12.35 28.6,13.3
  pour cut-out: 5.65,15.175 5.65,13.3 6.6,13.3
  pour cut-out: 6.725,16.25 14.6,16.25 14.6,15.3
  pour cut-out: 14.725,16.25 16.6,16.25 16.6,15.3
  pour cut-out: 18.475,16.25 16.6,16.25 16.6,15.3
  pour cut-out: 77.891,90.05 76.275,90.05 76.275,90.6
  pour cut-out: 76.384,91.15 78,91.15 78,90.6
  pour cut-out: 80.05,86.809 80.05,85.1 79.5,85.1
  pour cut-out: 78.95,86.809 78.95,85.1 79.5,85.1
  pour cut-out: 34.066,91.012 33.112,91.012 33.112,91.766
  pour cut-out: 34.888,89.034 34.888,90.234 33.288,90.234
  pour cut-out: 8.179,84.125 6.5,84.125 6.5,83
  pour cut-out: 5.522,82.61 7.55,82.61 7.55,85.082
  pour cut-out: 8.521,97.025 7,97.025 7,97.5
  pour cut-out: 5.522,98.54 7.55,98.54 7.55,96.512
  pour cut-out: 8.179,105.9 7,105.9 7,105.25
  pour cut-out: 5.522,104.385 7.55,104.385 7.55,106.413
  pour cut-out: 8.179,118.8 7,118.8 7,119.5
  pour cut-out: 5.522,120.315 7.55,120.315 7.55,117.843
  pour cut-out: 8.179,127.6 7,127.6 7,127
  pour cut-out: 5.522,126.085 7.55,126.085 7.55,128.113
  pour cut-out: 8.179,140.5 7,140.5 7,141
  pour cut-out: 5.522,142.015 7.55,142.015 7.55,139.987
  pour cut-out: 8.179,149.3 7,149.3 7,148.75
  pour cut-out: 5.522,147.785 7.55,147.785 7.55,149.813
  pour cut-out: 8.179,162.2 7,162.2 7,162.75
  pour cut-out: 5.522,163.715 7.55,163.715 7.55,161.687
  pour cut-out: 8.179,171 6.536,171 6.536,170.499
  pour cut-out: 5.522,169.485 7.55,169.485 7.55,171.513
  pour cut-out: 8.179,183.9 7,183.9 7,184.75
  pour cut-out: 5.522,185.415 7.55,185.415 7.55,183.387
  pour cut-out: 16.355,208.371 16.355,209.5 15.75,209.5
  pour cut-out: 14.84,211.028 14.84,209 16.868,209
  pour cut-out: 29.255,208.371 29.255,209.5 30,209.5
  pour cut-out: 28.742,209 30.77,209 30.77,211.028
  pour cut-out: 38.075,208.371 38.075,209 37.574,209
  pour cut-out: 36.56,211.028 36.56,209 38.588,209
  pour cut-out: 50.975,208.371 50.975,209.5 51.75,209.5
  pour cut-out: 50.462,209 52.49,209 52.49,211.028
  pour cut-out: 59.85,208.029 59.85,209.5 59,209.5
  pour cut-out: 60.363,209 58.421,209 58.421,210.594
  pour cut-out: 72.75,208.029 72.75,209.5 73.5,209.5
  pour cut-out: 72.237,209 74.179,209 74.179,210.594
  pour cut-out: 81.77,208.029 81.77,209.5 81,209.5
  pour cut-out: 82.283,209 80.341,209 80.341,210.594
  pour cut-out: 94.67,208.371 94.67,209.384 95.421,209.384
  pour cut-out: 94.157,209 95.421,209 95.421,209.384
  pour cut-out: 94.157,209 94.157,209.75 95.25,209.75
  pour cut-out: 96.099,210.594 96.099,209.384 95.421,209.384
  pour cut-out: 104.607,209 103,209 103,209.5
  pour cut-out: 103.65,208.371 103.65,209.5 103,209.5
  pour cut-out: 102.221,210.594 102.221,209 103,209
  pour cut-out: 116.55,208.371 116.55,209.5 117.25,209.5
  pour cut-out: 118.065,211.028 118.065,209 117.563,209
  pour cut-out: 116.037,209 117.563,209 117.563,209.816
  pour cut-out: 126.043,209 125.14,209 125.14,209.5
  pour cut-out: 125.53,208.371 125.53,209.5 124.75,209.5
  pour cut-out: 124.015,211.028 124.015,209.172 125.097,209.172
  pour cut-out: 138.43,208.371 138.43,209.25 139.25,209.25
  pour cut-out: 137.917,209 139.25,209 139.25,209.5
  pour cut-out: 139.945,211.028 139.945,208.75 139,208.75
  pour cut-out: 146.75,184.543 146.75,186 147.25,186
  pour cut-out: 148.778,187.015 146.75,187.015 146.75,186
  pour cut-out: 146.121,185.5 147.75,185.5 147.75,186
  pour cut-out: 145.779,172.6 148,172.6 148,171.75
  pour cut-out: 146.75,173.113 146.75,171.418 147.514,171.418
  pour cut-out: 148.778,171.085 146.25,171.085 146.25,171.75
  pour cut-out: 146.75,162.943 146.75,164.5 147.5,164.5
  pour cut-out: 148.778,165.415 146.25,165.415 146.25,164.25
  pour cut-out: 146.121,163.9 148,163.9 148,164.5
  pour cut-out: 146.75,151.957 146.75,150.625 147.75,150.625
  pour cut-out: 146.121,151 147.75,151 147.75,150.25
  pour cut-out: 148.778,149.485 146.5,149.485 146.5,150.25
  pour cut-out: 146.75,141.243 146.75,142.75 147.5,142.75
  pour cut-out: 148.778,143.715 146.75,143.715 146.75,142.75
  pour cut-out: 146.121,142.2 147.5,142.2 147.5,142.5
  pour cut-out: 146.75,130.257 146.75,128.5 147.75,128.5
  pour cut-out: 146.121,129.3 147.75,129.3 147.75,128.5
  pour cut-out: 148.778,127.785 146.5,127.785 146.5,128.25
  pour cut-out: 146.75,119.543 146.75,121 147.5,121
  pour cut-out: 148.778,122.015 146.25,122.015 146.25,121.25
  pour cut-out: 146.121,120.5 147.5,120.5 147.5,121
  pour cut-out: 145.779,107.6 147.75,107.6 147.75,107
  pour cut-out: 146.75,108.113 146.75,106.543 147.639,106.543
  pour cut-out: 148.778,106.085 146.5,106.085 146.5,107
  pour cut-out: 146.75,97.743 146.75,99.732 147.389,99.732
  pour cut-out: 148.778,100.215 146,100.215 146,99.25
  pour cut-out: 146.121,98.7 148.5,98.7 148.5,99.25
  pour cut-out: 146.75,86.757 146.75,85 147.5,85
  pour cut-out: 148.778,84.285 146.5,84.285 146.5,85
  pour cut-out: 146.121,85.8 148.75,85.8 148.75,85
  pour cut-out: 147.25,84.329 147.25,86.313 146.75,86.313
  pour cut-out: 141.138,72.5 146.362,72.5 146.362,72
  pour cut-out: 85.091,81.15 86.15,81.15 86.15,81.7
  pour cut-out: 85.091,82.25 86.15,82.25 86.15,81.7
  pour cut-out: 110.1,67.939 110.1,69.713 109.663,69.713
  pour cut-out: 103.554,67.175 109.425,67.175 109.425,67.85
  pour cut-out: 35.71,91.01 33.91,91.01 33.9,91 35.088,89.812 35.71,89.812
  pour cut-out: 82.5,83.6 82.5,84.8 83.2,84.8
  pour cut-out: 19.55,15.425 19.55,14.65 19.95,14.25 28.6,14.25 28.6,13.3 19,13.4 19,13.6 18.3,14.3
  pour cut-out: 142.5,27.838 136.588,27.838 136.55,27.8 136.55,28.6 141.75,28.6
  pour cut-out: 142.5,30.562 136.25,30.562 136.25,30 136.45,29.8 141.45,29.8
  pour cut-out: 118.55,72.51 119.06,72.51 119.06,72.31 119.05,72.3 118.55,72.3
  pour cut-out: 12.25,56.038 16.1,56.038 16.1,56.684 16.09,56.694 13.41,56.694
  pour cut-out: 16.347,58.762 12.25,58.762 12.544,58.468 15.898,58.468
Bottom:
  drawing of 428 lines, arcs and shapes, not listed

## Silkscreen, mask and mechanical layers (free items; w line width, h text height)
Top Overlay:
  circle w0.2: c69.914,125.322 r0.951
  circle w0.2: c68.799,63.25 r0.951
  circle w0.2: c84.527,27.648 r0.951
  circle w0.2: c84.027,42.898 r0.951
  circle w0.2: c98.527,45.398 r0.951
  circle w0.2: c39.973,64.852 r0.951
  circle w0.2: c38.255,69.709 r0.951
  region: 15,19.75 15,17 13.25,17
  region: 20.5,19.75 20.5,17 22.5,17
  region: 83.81,6.9 85,6.9 85,6.25
  region: 83.81,6.9 85,6.9 85,7.75
  region: 73.65,3.09 76.486,3.09 76.486,0.968
  region: 83.81,3.09 81,3.09 81,1
  lines w0.2: 15.5,17.05 16.025,17.05 ; 27.875,100.125 38.65,110.9 38.775,110.9 77.1,110.9 ; 36.452,69.709 38.959,69.709 ; 38.171,64.852 40.678,64.852 ; 38.5,69.25 38.959,69.709 ; 38.5,70.169 38.959,69.709 ; 40.219,64.392 40.678,64.852 ; 40.219,65.311 40.678,64.852 ; 66.996,63.25 69.504,63.25 ; 68.112,125.322 70.619,125.322 ; 69.044,62.791 69.504,63.25 ; 69.044,63.709 69.504,63.25 ; 70.159,124.863 70.619,125.322 ; 70.159,125.782 70.619,125.322 ; 77.1,141.3 77.1,110.9 ; 77.1,156.5 77.1,190.9 77.1,216 ; 83.781,42.439 83.322,42.898 ; 83.781,43.358 83.322,42.898 ; 84.281,27.189 83.822,27.648 ; 84.281,28.108 83.822,27.648 ; 85.829,42.898 83.322,42.898 ; 86.329,27.648 83.822,27.648 ; 98.281,44.939 97.822,45.398 ; 98.281,45.858 97.822,45.398 ; 100.329,45.398 97.822,45.398 ; 117.65,12.5 120.05,12.5 ; 118.85,11.3 118.85,13.7 ; 122.25,12.5 124.75,12.5 ; 126.007,100.293 115.4,110.9 77.1,110.9 ; 60.8,151.3 93.8,151.3 ; 60.8,151.3 60.8,141.4 93.8,141.4 93.8,151.3 ; 60.8,151.3 93.8,151.3 ; 60.8,151.3 60.8,156.5 93.8,156.5 93.8,151.3 ; 19.45,47.8 22.75,44.5 27.511,44.5 30.85,47.839 30.85,68.876 30.85,71.611 27.511,74.95 22.789,74.95 19.45,71.611 19.45,47.8 ; 106.2,26.139 109.589,22.75 133.261,22.75 136.612,26.101 136.612,30.899 133.311,34.2 112.274,34.2 109.539,34.2 106.2,30.861 106.2,26.139 ; 120.15,54.85 120.15,78.9 123.25,82 128.211,82 131.55,78.661 131.55,75.926 131.55,56.876 131.55,54.889 128.211,51.55 123.45,51.55 120.15,54.85
  lines w0.3: 105.9,2.8 136.6,2.8 136.6,14.4 105.9,14.4 105.9,2.8
  text "LAN_2" at 28.25,181.288 h5
  text "LAN_1" at 44.713,181.288 h5
  text "LAN_0" at 60.8,181.288 h5
  text "LAN_7" at 82.068,181.288 h5
  text "LAN_6" at 98.426,181.288 h5
  text "LAN_5" at 114.521,181.288 h5
  text "ИЛ196СП1/1" at 66.6,152.2 h6
  text "LAN_3" at 28.25,144.79 h5
  text "LAN_4" at 114.752,144.79 h5
  text "Стенд для  / RTL8316  / RTL8208" at 60.8,141.4 h5
  text "LAN_4" at 28.352,138.788 h5
  text "LAN_3" at 114.65,138.788 h5
  text "LAN_5" at 28.236,132.787 h5
  text "LAN_2" at 114.648,132.787 h5
  text "LAN_6" at 28.303,126.789 h5
  text "LAN_1" at 114.835,126.789 h5
  text "AGND" at 69.842,121.21 h3
  text "LAN_7" at 28.171,120.788 h5
  text "LAN_0" at 114.696,120.788 h5
  text "8 ETHERNET портов" at 44.25,111.38 h4
  text "8 ETHERNET портов" at 84.516,111.38 h4
  text "RTL8208" at 51.312,107.763 h4
  text "RTL8208_DUT" at 88.023,107.13 h4
  text "RX" at 39.559,68.46 h3
  text "1V8_8208" at 121.028,65.75 h3
  text "TX" at 41.256,63.46 h3
  text "DGND" at 68.171,59.21 h3
  text "AMP_8316" at 19.665,58.723 h3
  text "I - всегда вкл. / О - амперметр" at 138,57.559 h3
  text "I - всегда вкл. / О - амперметр" at 1,50.025 h3
  text "RX" at 93.309,43.96 h3
  text "TX" at 79.256,41.46 h3
  text "RESET" at 4.617,30.196 h4
  text "MDC" at 77.85,26.75 h3
  text "MDIO" at 77.874,24.5 h3
  text "3V3_8208" at 123.277,23.212 h3 r90
  text "RTL8316" at 36.562,18.446 h3
  text "LED" at 14.98,16.96 h3
  text "I - всегда вкл. / О - амперметр" at 138,11.184 h3
  text "PWS" at 118.575,7.21 h3
  text "PROG" at 76.486,0.968 h2
Bottom Overlay:
  text "ИЛ196СП1/1" at 95.572,178.838 h10
Board:
  the board outline again, w0.1
Top Assy:
  lines w0.1: 1,1 154,1 154,216 1,216 1,1

## Dimensions
155,0 to 155,217 on Plata
0,0 to 155,0 on Plata

## Text inside footprints (layer, text, board x,y; h text height)
VD2: Top Overlay "+" at 91.1,14.1 h1.5
VD3: Top Overlay "+" at 130,43.45 h3 r180